# Altium PCB MCU.pcbdoc (part 1 of 2)
Units mil, origin at the board's own origin, x right, y up, seen from the top; angles counter-clockwise.
Board outline 2362.2 x 2637.8 mil, 2 copper layers (Top Layer, Bottom Layer), stack 62.2 mil thick; 37 components, 44 nets, 211 pads, 87 vias.
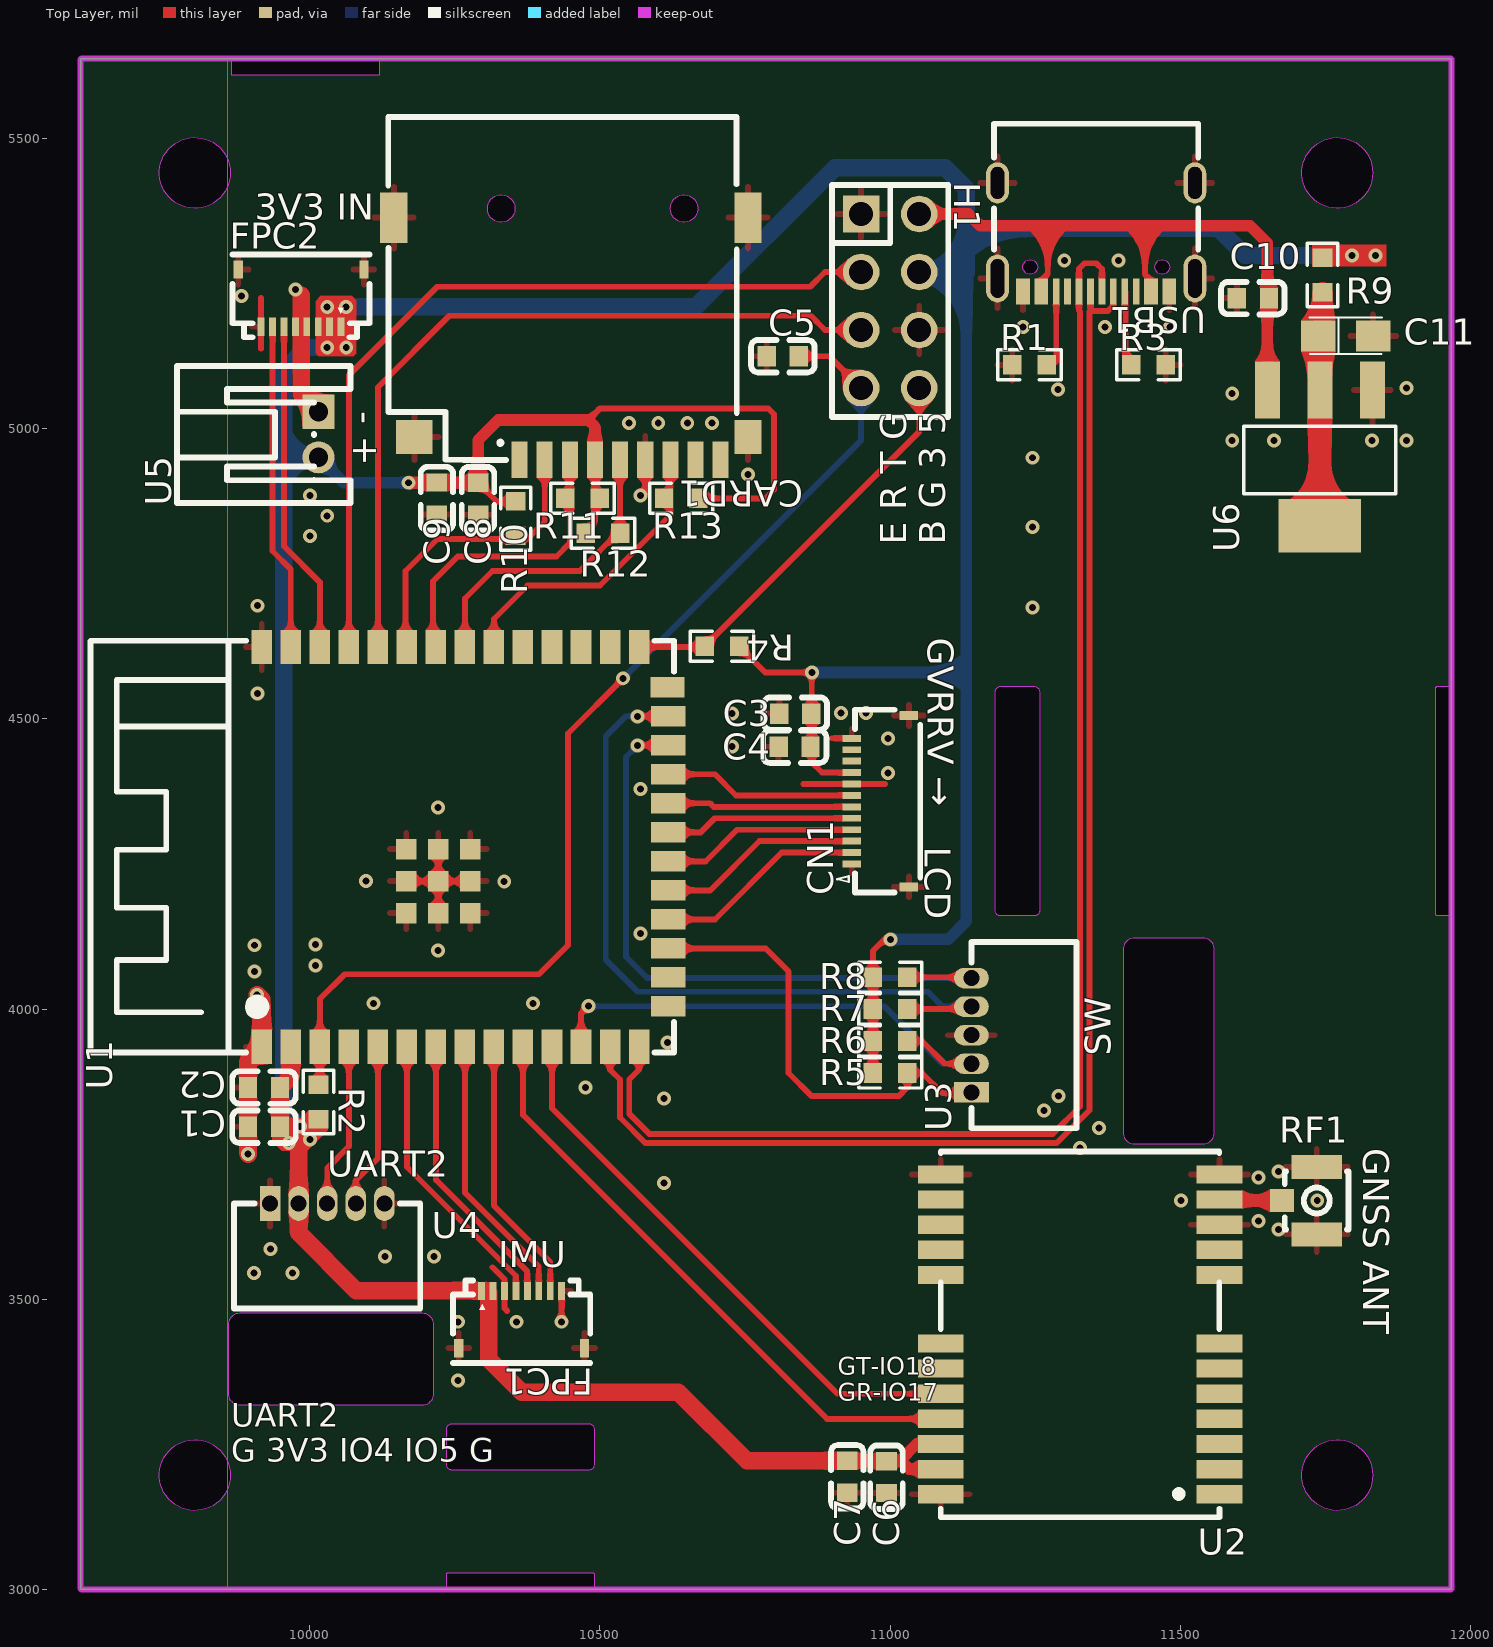
[diagram p0: Top Layer view]
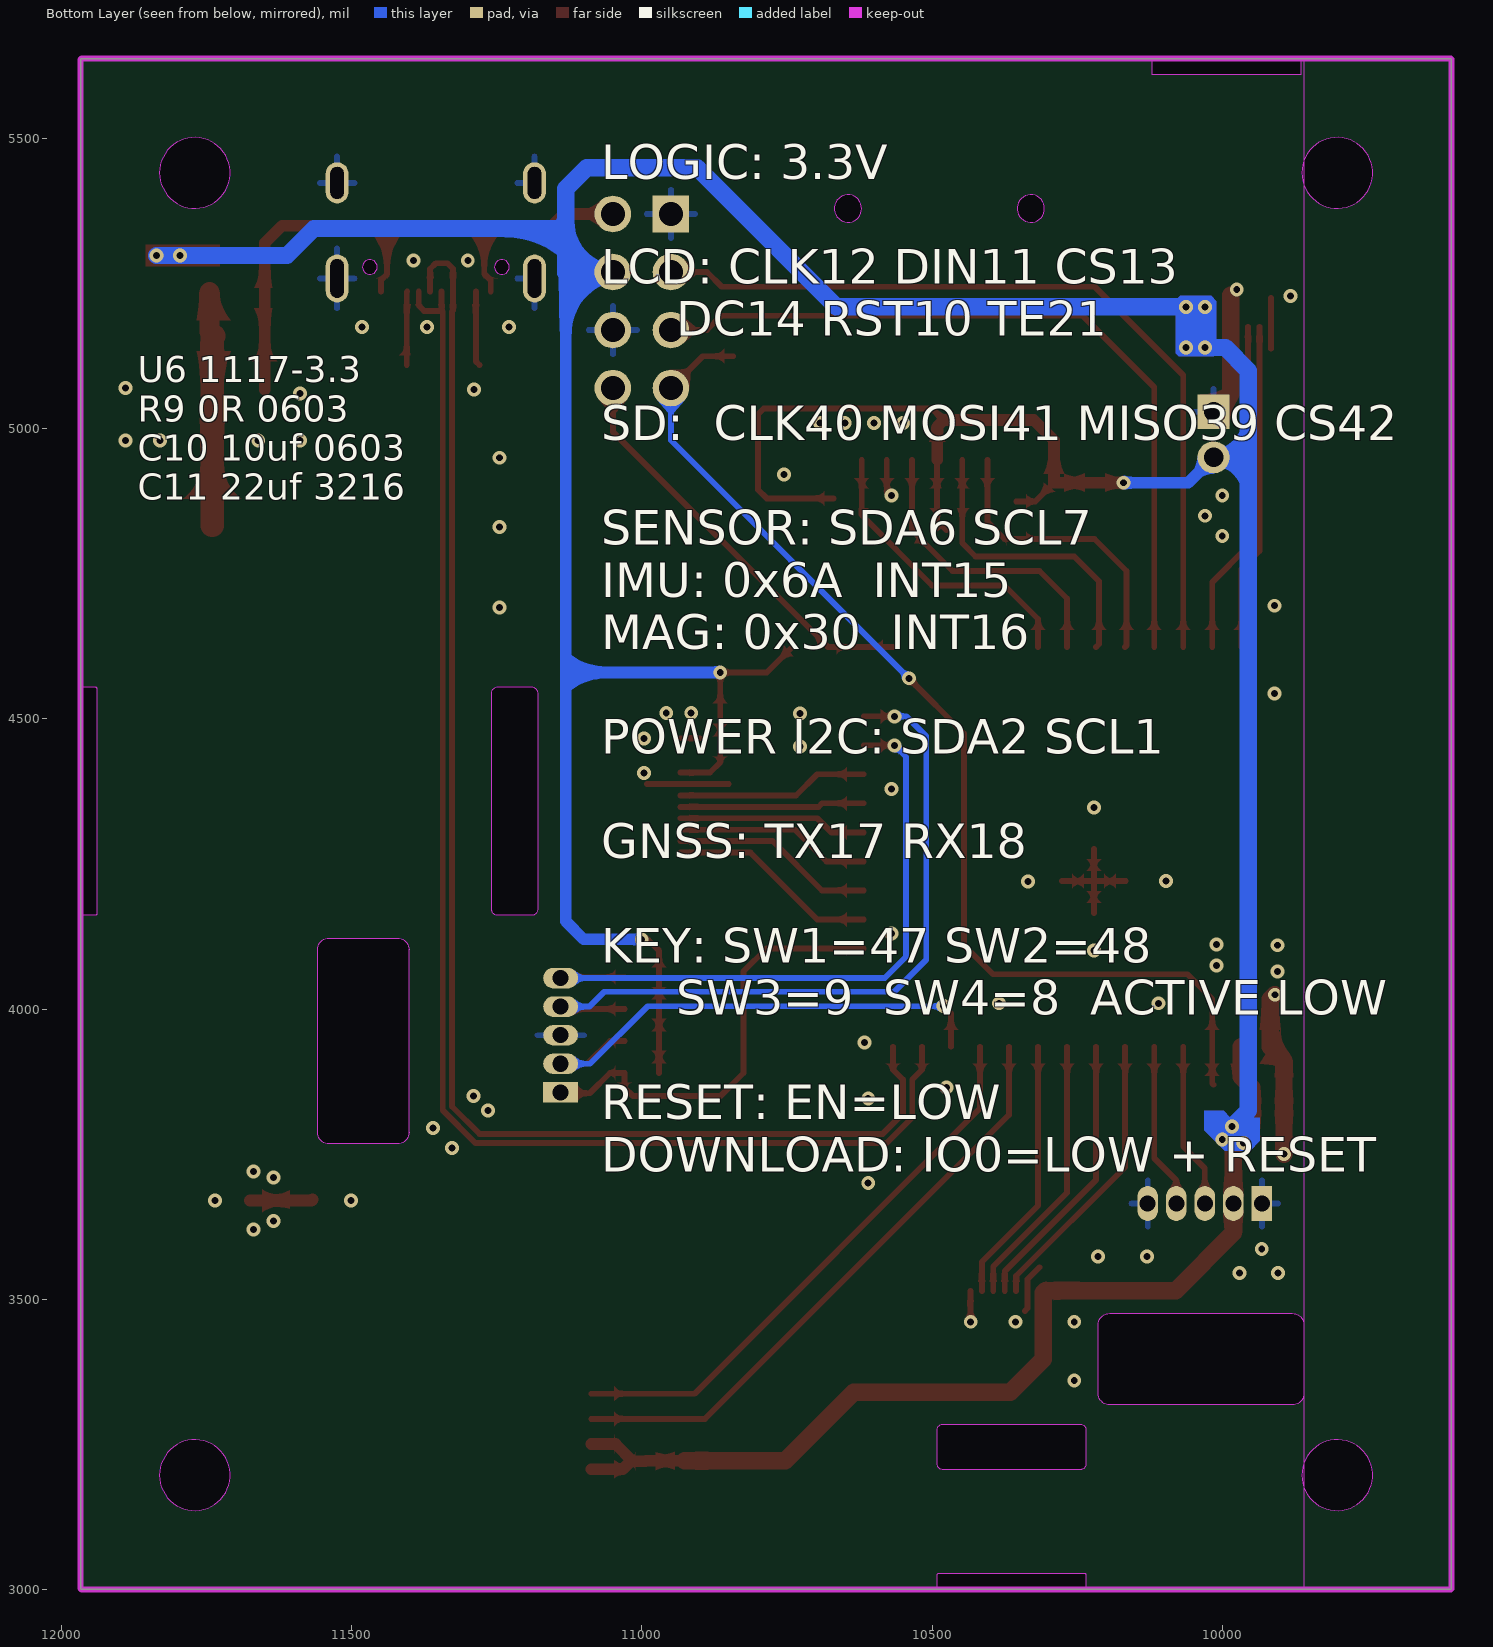
[diagram p1: Bottom Layer view, seen from below]

## Layer stack, top to bottom
Top Solder Mask Layer: solder mask 0.4, Dk 3.3
Top Layer: signal copper 1.4
Dielectric1: surface 59.4, FR4, Dk 4.5
Bottom Layer: signal copper 1.4
Bottom Solder Mask Layer: solder mask 0.4, Dk 3.3

## Board outline
9607,5637.8 ccw(c9607,5635.8) 9605,5635.8 9605,3002 ccw(c9607,3002) 9607,3000 11965.2,3000 ccw(c11965.2,3002) 11967.2,3002 11967.2,5635.8 ccw(c11965.2,5635.8) 11965.2,5637.8
cut-out: 9862.9,3196.9 9862.5,3189.9 9861.3,3183 9859.3,3176.3 9856.6,3169.9 9853.2,3163.9 9849.1,3158.2 9844.4,3153.1 9839.1,3148.5 9833.4,3144.6 9827.2,3141.3 9820.7,3138.8 9814,3137 9807.1,3136.1 9800.1,3135.9 9793.2,3136.4 9786.3,3137.8 9779.7,3140 9773.4,3142.9 9767.4,3146.5 9761.9,3150.7 9756.9,3155.6 9752.5,3161 9748.7,3166.8 9745.6,3173.1 9743.3,3179.7 9741.7,3186.4 9740.9,3193.4 9740.9,3200.3 9741.7,3207.3 9743.3,3214 9745.6,3220.6 9748.7,3226.9 9752.5,3232.7 9756.9,3238.1 9761.9,3243 9767.4,3247.2 9773.4,3250.8 9779.7,3253.7 9786.3,3255.9 9793.2,3257.3 9800.1,3257.8 9807.1,3257.7 9814,3256.7 9820.7,3254.9 9827.2,3252.4 9833.4,3249.1 9839.1,3245.2 9844.4,3240.6 9849.1,3235.5 9853.2,3229.8 9856.6,3223.8 9859.3,3217.4 9861.3,3210.7 9862.5,3203.8
cut-out: 9862.9,5440.9 9862.5,5434 9861.3,5427.1 9859.3,5420.4 9856.6,5414 9853.2,5408 9849.1,5402.3 9844.4,5397.2 9839.1,5392.6 9833.4,5388.7 9827.2,5385.4 9820.7,5382.9 9814,5381.1 9807.1,5380.1 9800.1,5379.9 9793.2,5380.5 9786.3,5381.9 9779.7,5384.1 9773.4,5387 9767.4,5390.6 9761.9,5394.8 9756.9,5399.7 9752.5,5405.1 9748.7,5410.9 9745.6,5417.2 9743.3,5423.8 9741.7,5430.5 9740.9,5437.5 9740.9,5444.4 9741.7,5451.4 9743.3,5458.1 9745.6,5464.7 9748.7,5471 9752.5,5476.8 9756.9,5482.2 9761.9,5487.1 9767.4,5491.3 9773.4,5494.9 9779.7,5497.8 9786.3,5500 9793.2,5501.3 9800.1,5501.9 9807.1,5501.7 9814,5500.8 9820.7,5499 9827.2,5496.5 9833.4,5493.2 9839.1,5489.3 9844.4,5484.7 9849.1,5479.6 9853.2,5473.9 9856.6,5467.9 9859.3,5461.5 9861.3,5454.8 9862.5,5447.9
cut-out: 11831.4,3196.9 11831,3189.9 11829.8,3183 11827.8,3176.3 11825.1,3169.9 11821.7,3163.9 11817.6,3158.2 11812.9,3153.1 11807.6,3148.5 11801.9,3144.6 11795.7,3141.3 11789.2,3138.8 11782.5,3137 11775.6,3136.1 11768.6,3135.9 11761.7,3136.4 11754.8,3137.8 11748.2,3140 11741.9,3142.9 11735.9,3146.5 11730.4,3150.7 11725.4,3155.6 11721,3161 11717.2,3166.8 11714.1,3173.1 11711.8,3179.7 11710.2,3186.4 11709.4,3193.4 11709.4,3200.3 11710.2,3207.3 11711.8,3214 11714.1,3220.6 11717.2,3226.9 11721,3232.7 11725.4,3238.1 11730.4,3243 11735.9,3247.2 11741.9,3250.8 11748.2,3253.7 11754.8,3255.9 11761.7,3257.3 11768.6,3257.8 11775.6,3257.7 11782.5,3256.7 11789.2,3254.9 11795.7,3252.4 11801.9,3249.1 11807.6,3245.2 11812.9,3240.6 11817.6,3235.5 11821.7,3229.8 11825.1,3223.8 11827.8,3217.4 11829.8,3210.7 11831,3203.8
cut-out: 11831.4,5440.9 11831,5434 11829.8,5427.1 11827.8,5420.4 11825.1,5414 11821.7,5408 11817.6,5402.3 11812.9,5397.2 11807.6,5392.6 11801.9,5388.7 11795.7,5385.4 11789.2,5382.9 11782.5,5381.1 11775.6,5380.1 11768.6,5379.9 11761.7,5380.5 11754.8,5381.9 11748.2,5384.1 11741.9,5387 11735.9,5390.6 11730.4,5394.8 11725.4,5399.7 11721,5405.1 11717.2,5410.9 11714.1,5417.2 11711.8,5423.8 11710.2,5430.5 11709.4,5437.5 11709.4,5444.4 11710.2,5451.4 11711.8,5458.1 11714.1,5464.7 11717.2,5471 11721,5476.8 11725.4,5482.2 11730.4,5487.1 11735.9,5491.3 11741.9,5494.9 11748.2,5497.8 11754.8,5500 11761.7,5501.3 11768.6,5501.9 11775.6,5501.7 11782.5,5500.8 11789.2,5499 11795.7,5496.5 11801.9,5493.2 11807.6,5489.3 11812.9,5484.7 11817.6,5479.6 11821.7,5473.9 11825.1,5467.9 11827.8,5461.5 11829.8,5454.8 11831,5447.9
cut-out: 9879,3475.6 ccw(c9879,3455.9) 9859.3,3455.9 9859.3,3337.8 ccw(c9879,3337.8) 9879,3318.1 10194,3318.1 ccw(c10194,3337.8) 10213.7,3337.8 10213.7,3455.9 ccw(c10194,3455.9) 10194,3475.6 9879,3475.6
cut-out: 11401.3,3787.5 ccw(c11420.9,3787.5) 11420.9,3767.8 11539.1,3767.8 ccw(c11539.1,3787.5) 11558.7,3787.5 11558.7,4102.5 ccw(c11539.1,4102.5) 11539.1,4122.2 11420.9,4122.2 ccw(c11420.9,4102.5) 11401.3,4102.5
cut-out: 11189.6,4555.1 ccw(c11189.6,4545.3) 11179.8,4545.3 11179.8,4171.3 ccw(c11189.6,4171.3) 11189.6,4161.4 11248.7,4161.4 ccw(c11248.7,4171.3) 11258.5,4171.3 11258.5,4545.3 ccw(c11248.7,4545.3) 11248.7,4555.1 11189.6,4555.1
cut-out: 10244.8,3285 ccw(c10244.8,3275.2) 10235,3275.2 10235,3216.1 ccw(c10244.8,3216.1) 10244.8,3206.3 10481.1,3206.3 ccw(c10481.1,3216.1) 10490.9,3216.1 10490.9,3275.2 ccw(c10481.1,3275.2) 10481.1,3285 10244.8,3285
cut-out: 9864.3,5637.8 9864.3,5610.2 10120.2,5610.2 10120.2,5637.8
cut-out: 11941.6,4555.1 ccw(c11941.6,4553.1) 11939.6,4553.1 11939.6,4163.4 ccw(c11941.6,4163.4) 11941.6,4161.4 11965.2,4161.4 ccw(c11965.2,4163.4) 11967.2,4163.4 11967.2,4553.1 ccw(c11965.2,4553.1) 11965.2,4555.1
cut-out: 10236.9,3027.6 ccw(c10236.9,3025.6) 10234.9,3025.6 10234.9,3002 ccw(c10236.9,3002) 10236.9,3000 10488.9,3000 ccw(c10488.9,3002) 10490.8,3002 10490.8,3025.6 ccw(c10488.9,3025.6) 10488.9,3027.6 10236.9,3027.6

## Design rules (kind name [scope] priority, off if disabled: settings)
BoardOutlineClearance copperThickness1oz [All] p0: genericclearance=10 ignorepadtopadclearanceinfootprint=FALSE except(0: Arc-SplitContinuation Track-SplitContinuation SMDPad-SplitContinuation THPad-SplitContinuation Via-SplitContinuation Fill-SplitContinuation Poly-SplitContinuation Region-SplitContinuation Text-SplitContinuation)
BoardOutlineClearance copperThickness2oz [All] p0: genericclearance=10 ignorepadtopadclearanceinfootprint=FALSE except(0: Arc-SplitContinuation Track-SplitContinuation SMDPad-SplitContinuation THPad-SplitContinuation Via-SplitContinuation Fill-SplitContinuation Poly-SplitContinuation Region-SplitContinuation Text-SplitContinuation)
BoardOutlineClearance otherClearance [All] p0: genericclearance=10 ignorepadtopadclearanceinfootprint=FALSE except(0: Arc-SplitContinuation Track-SplitContinuation SMDPad-SplitContinuation THPad-SplitContinuation Via-SplitContinuation Fill-SplitContinuation Poly-SplitContinuation Region-SplitContinuation Text-SplitContinuation)
Clearance copperThickness1oz [All] p1: gap=7 ignorepadtopadclearanceinfootprint=FALSE
Clearance copperThickness2oz [All] p1: gap=7 ignorepadtopadclearanceinfootprint=FALSE
Clearance otherClearance [All] p1: gap=7 ignorepadtopadclearanceinfootprint=FALSE
DiffPairsRouting differentialPair [All] p1: maxuncoupledlength=10 minlimit=6 maxlimit=Infinity mostfreqgap=6 toplayer_minwidth=5 toplayer_prefwidth=10 toplayer_maxwidth=100 bottomlayer_minwidth=5 bottomlayer_prefwidth=10 bottomlayer_maxwidth=100
PasteMaskExpansion pasteMaskExpansion [All] p1: expansion=0
PlaneConnect innerPlane [All] p1: planeconnectstyle=Relief reliefexpansion=20 reliefentries=4 reliefconductorwidth=10 reliefairgap=10
PolygonConnect copperRegion [All] p1: connectstyle=Relief reliefentries=4 reliefconductorwidth=10 polygonreliefangle="90 Angle" airgapwidth=10
RoutingVias viaSize [All] p1: viastyle="Through Hole" holewidth=12.0078 minholewidth=11.811 maxholewidth=248.0314 width=12.0078 minwidth=11.811 maxwidth=248.0314
SolderMaskExpansion solderMaskExpansion [IsVia] p1: useseparateexpansions=TRUE expansion=-1000 expansionbottom=-1000
SolderMaskExpansion solderMaskExpansion [All] p2: useseparateexpansions=TRUE expansion=2 expansionbottom=2
Width copperThickness1oz [All] p1: maxlimit=100 minlimit=5 preferedwidth=10
Width copperThickness2oz [All] p1: maxlimit=100 minlimit=8 preferedwidth=10

## Components (designator, comment, footprint, x,y, rotation, side; value= is the part's Value field where it differs from the comment)
C1 "10uF" C0603#1 9921.2,3797.3 r180 top
C2 "100nF" C0603#1 9921.2,3864.9 r180 top
C3 "100nF" C0603#1 10836.6,4509.1 r0 top
C4 "10uF" C0603#2 10835.4,4452.1 r0 top
C5 "10uF" C0603#3 10815,5125 r0 top
C6 "100nF" C0603#1 10993.7,3193.5 r90 top
C7 "10uF" C0603#2 10926,3194.2 r90 top
C8 "10uF" C0603#2 10289.9,4879.4 r90 top
C9 "100nF" C0603#2 10218.9,4879.7 r90 top
C10 "10uF" C0603#3 11625,5225 r0 top
C11 "22uF" CASE-A_3216 11785,5160 r0 top
CARD1 "TF PUSH" TF-SMD_TF-PUSH 10450,5155 r180 top
CN1 "HC-FPC-05-09-12RLTAG" CONN-SMD_12P-P0.50_HCTL_HC-FPC-05-09-12RLTAG 10983,4358.3 r90 top
FPC1 "HC-FPC-05-09-8RLTAG" FPC-SMD_8P-P0.50_HC-FPC-05-09-8RLTAG 10365,3465 r180 top
FPC2 "HC-FPC-05-09-8RLTAG" FPC-SMD_8P-P0.50_HC-FPC-05-09-8RLTAG 9985,5225 r0 top
H1 "LAIL-PZ2.54-4PX2-L" HDR-TH_LAIL-PZ2.54-4PX2-L 11000,5220 r270 top
R1 "5.1kΩ" R0603 11240,5110 r180 top
R2 "10kΩ" R0603 10015,3840 r270 top
R3 "5.1kΩ" R0603 11445,5110 r0 top
R4 "10kΩ" R0603 10710,4625 r180 top
R5 "10kΩ" R0603 11000,3890 r0 top
R6 "10kΩ" R0603 11000,3945 r0 top
R7 "10kΩ" R0603 11000,4000 r0 top
R8 "10kΩ" R0603 11000,4055 r0 top
R9 "0Ω" R0603 11745,5265 r270 top
R10 "10kΩ" R0603 10355,4845 r90 top
R11 "10kΩ" R0603 10470,4880 r0 top
R12 "10kΩ" R0603 10505,4820 r180 top
R13 "10kΩ" R0603 10640,4880 r0 top
RF1 "6GHz" IPEX-SMD_BWIPX-1-001E 11705,3670 r0 top
U1 "2.4GHz" WIRELM-SMD_ESP32-S3-WROOM-1 10267.5,4279.5 r90 top
U2 "ATGM332D-F8N76" GPS-SMD_ATGM332D-6S74 11327.2,3439.5 r0 top
U3 "BX-MX1.25-5PWZ" CONN-TH_5P-P1.25_BX-MX1.25-5PWZ 11140,3955 r90 top
U4 "BX-MX1.25-5PWZ" CONN-TH_5P-P1.25_BX-MX1.25-5PWZ 10030,3665 r0 top
U5 "S2B-PH-K-S(LF)(SN)" CONN-TH_S2B-PH-K-S-LF-SN 10015,4990 r90 top
U6 "AMS1117-3.3" SOT-223-3_L6.5-W3.4-P2.30-LS7.0-BR 11740.4,4950 r90 top
USB1 "LAIL-TYPE-C-16PIN-08-WT" TYPE-C-SMD_LAIL-TYPE-C-16PIN-08-WT 11355,5330 r180 top

## Footprints (in the part's own frame and the unit in brackets; to place one, negate y for a bottom-side part, rotate by r counter-clockwise, add the part's x,y. Pads: shape width x height; smd on the part's side, far side on the other; paste and mask are expansions set on the pad)
C0603#1 [mil]
  rect 31.5x35.4 smd: 1(-27.5,0) 2(27.6,0)
  silkscreen extent -55,-28 55,28
C0603#2 [mil]
  rect 31.5x35.4 smd: 1(-27.6,0) 2(27.5,0)
  silkscreen extent -55,-28 55,28
C0603#3 [mil]
  rect 31.5x35.4 smd: 1(-27.6,0) 2(27.6,0)
  silkscreen extent -55,-28 55,28
CASE-A_3216 [mil]
  rect 59.1x53.5 smd: 1(-47.2,0) 2(47.2,0)
  silkscreen extent -63,-32 63,32
CONN-SMD_12P-P0.50_HCTL_HC-FPC-05-09-12RLTAG [mil]
  rect 11.8x31.5 smd paste+0 mask+2: 1(-108.3,49.3) 2(-88.6,49.3) 3(-68.9,49.3) 4(-49.2,49.3) 5(-29.6,49.3) 6(-9.9,49.3) 7(9.8,49.3) 8(29.5,49.3) 9(49.2,49.3) 10(68.9,49.3) 11(88.6,49.3) 12(108.2,49.3)
  rect 15.7x31.5 smd paste+0 mask+2: 13(147.6,-49.2) 14(-147.7,-49.2)
  silkscreen extent -158,-69 157,74
CONN-TH_5P-P1.25_BX-MX1.25-5PWZ [mil]
  rect 35.4x60 hole 27.6: 1(-98.4,0)
  oval 35.4x60 hole 27.6: 2(-49.2,0) 3(0,0) 4(49.2,0) 5(98.4,0)
  silkscreen extent -160,-181 160,0
CONN-TH_S2B-PH-K-S-LF-SN [mil]
  rect 59.1x55.1 hole 33.5: 1(39.4,0)
  round 55.1 hole 33.5: 2(-39.4,0)
  silkscreen extent -118,-55 118,244
FPC-SMD_8P-P0.50_HC-FPC-05-09-8RLTAG [mil]
  rect 11.8x31.5 smd paste+0 mask+2: 1(68.9,-49.2) 2(49.2,-49.2) 3(29.5,-49.2) 4(9.8,-49.2) 5(-9.8,-49.2) 6(-29.5,-49.2) 7(-49.2,-49.2) 8(-68.9,-49.2)
  rect 15.7x31.5 smd paste+0 mask+2: 9(-108.3,49.2) 10(108.3,49.2)
  silkscreen extent -118,-67 118,75
GPS-SMD_ATGM332D-6S74 [mil]
  rect 78.7x31.5 smd paste+0 mask+2: 1(240.2,-275.6) 2(240.2,-232.3) 3(240.2,-189) 4(240.2,-145.6) 5(240.2,-102.3) 6(240.2,-59) 7(240.2,-15.7) 8(240.2,102.4) 9(240.2,145.7) 10(240.2,189) 11(240.2,232.3) 12(240.2,275.6) 13(-240.1,275.6) 14(-240.1,232.3) 15(-240.1,189) 16(-240.1,145.7) 17(-240.1,102.4) 18(-240.1,-15.7) 19(-240.1,-59) 20(-240.1,-102.3) 21(-240.1,-145.6) 22(-240.1,-189) 23(-240.1,-232.3) 24(-240.1,-275.6)
  silkscreen extent -240,-315 240,315
HDR-TH_LAIL-PZ2.54-4PX2-L [mil]
  rect 63x63 hole 41.3 paste+0 mask+2: 1(-150,-50)
  round 63 hole 41.3 paste+0 mask+2: 2(-150,50) 3(-50,-50) 4(-50,50) 5(50,-50) 6(50,50) 7(150,-50) 8(150,50)
  silkscreen extent -200,-100 200,100
IPEX-SMD_BWIPX-1-001E [mil]
  rect 41.3x39.4 smd: 1(-30,0)
  rect 86.6x41.3 smd: 2(30,-58.1) 3(30,58.1)
  silkscreen extent -25,-50 85,50
R0603 [mil]
  rect 31.8x34 smd paste-3937 mask+2: 1(-29.7,0) 2(29.7,0)
  silkscreen extent -54,-26 54,26
SOT-223-3_L6.5-W3.4-P2.30-LS7.0-BR [mil]
  rect 98.4x43.3 smd: 1(116.9,-90.6) 2(116.9,0) 3(116.9,90.5)
  rect 92.1x141.7 smd: 4(-116.9,0)
  silkscreen extent -62,-131 54,131
TF-SMD_TF-PUSH [mil]
  rect 27.6x63 smd: 1(88.6,208.7) 2(45.3,208.7) 3(2,208.7) 4(-41.3,208.7) 5(-84.6,208.7) 6(-128,208.7) 7(-171.3,208.7) 8(-214.6,208.7) CD(-257.9,208.7)
  rect 47.2x59.1 smd: 10(-305.1,169.3)
  rect 47.2x86.6 smd: 11(-305.1,-208.7) 12(305.1,-208.7)
  rect 63x59.1 smd: 13(269.7,169.3)
  Board Outline Layer lines w0.1: 143.7,-224.4 143.3,-228.6 142.2,-232.7 140.4,-236.5 137.9,-240 134.8,-242.9 131.3,-245.2 127.4,-246.9 123.3,-247.8 119,-248 114.8,-247.4 110.8,-246.1 107.1,-244.1 103.8,-241.5 101,-238.3 98.8,-234.7 97.3,-230.7 96.6,-226.5 96.6,-222.3 97.3,-218.1 98.8,-214.2 101,-210.5 103.8,-207.3 107.1,-204.7 110.8,-202.7 114.8,-201.4 119,-200.8 123.3,-201 127.4,-201.9 131.3,-203.6 134.8,-205.9 137.9,-208.9 140.4,-212.3 142.2,-216.1 143.3,-220.2 143.7,-224.4 ; -171.3,-224.4 -171.6,-228.6 -172.8,-232.7 -174.6,-236.5 -177.1,-240 -180.2,-242.9 -183.7,-245.2 -187.6,-246.9 -191.7,-247.8 -195.9,-248 -200.1,-247.4 -204.2,-246.1 -207.9,-244.1 -211.2,-241.5 -214,-238.3 -216.2,-234.7 -217.7,-230.7 -218.4,-226.5 -218.4,-222.3 -217.7,-218.1 -216.2,-214.2 -214,-210.5 -211.2,-207.3 -207.9,-204.7 -204.2,-202.7 -200.1,-201.4 -195.9,-200.8 -191.7,-201 -187.6,-201.9 -183.7,-203.6 -180.2,-205.9 -177.1,-208.9 -174.6,-212.3 -172.8,-216.1 -171.6,-220.2 -171.3,-224.4
  Board Outline Layer region: -171.3,-224.4 -171.6,-228.6 -172.8,-232.7 -174.6,-236.5 -177.1,-240 -180.2,-242.9 -183.7,-245.2 -187.6,-246.9 -191.7,-247.8 -195.9,-248 -200.1,-247.4 -204.2,-246.1 -207.9,-244.1 -211.2,-241.5 -214,-238.3 -216.2,-234.7 -217.7,-230.7 -218.4,-226.5 -218.4,-222.3 -217.7,-218.1 -216.2,-214.2 -214,-210.5 -211.2,-207.3 -207.9,-204.7 -204.2,-202.7 -200.1,-201.4 -195.9,-200.8 -191.7,-201 -187.6,-201.9 -183.7,-203.6 -180.2,-205.9 -177.1,-208.9 -174.6,-212.3 -172.8,-216.1 -171.6,-220.2
  Board Outline Layer region: -171.3,-224.4 -171.6,-228.6 -172.8,-232.7 -174.6,-236.5 -177.1,-240 -180.2,-242.9 -183.7,-245.2 -187.6,-246.9 -191.7,-247.8 -195.9,-248 -200.1,-247.4 -204.2,-246.1 -207.9,-244.1 -211.2,-241.5 -214,-238.3 -216.2,-234.7 -217.7,-230.7 -218.4,-226.5 -218.4,-222.3 -217.7,-218.1 -216.2,-214.2 -214,-210.5 -211.2,-207.3 -207.9,-204.7 -204.2,-202.7 -200.1,-201.4 -195.9,-200.8 -191.7,-201 -187.6,-201.9 -183.7,-203.6 -180.2,-205.9 -177.1,-208.9 -174.6,-212.3 -172.8,-216.1 -171.6,-220.2
  Board Outline Layer region: 143.7,-224.4 143.3,-228.6 142.2,-232.7 140.4,-236.5 137.9,-240 134.8,-242.9 131.3,-245.2 127.4,-246.9 123.3,-247.8 119,-248 114.8,-247.4 110.8,-246.1 107.1,-244.1 103.8,-241.5 101,-238.3 98.8,-234.7 97.3,-230.7 96.6,-226.5 96.6,-222.3 97.3,-218.1 98.8,-214.2 101,-210.5 103.8,-207.3 107.1,-204.7 110.8,-202.7 114.8,-201.4 119,-200.8 123.3,-201 127.4,-201.9 131.3,-203.6 134.8,-205.9 137.9,-208.9 140.4,-212.3 142.2,-216.1 143.3,-220.2
  Board Outline Layer region: 143.7,-224.4 143.3,-228.6 142.2,-232.7 140.4,-236.5 137.9,-240 134.8,-242.9 131.3,-245.2 127.4,-246.9 123.3,-247.8 119,-248 114.8,-247.4 110.8,-246.1 107.1,-244.1 103.8,-241.5 101,-238.3 98.8,-234.7 97.3,-230.7 96.6,-226.5 96.6,-222.3 97.3,-218.1 98.8,-214.2 101,-210.5 103.8,-207.3 107.1,-204.7 110.8,-202.7 114.8,-201.4 119,-200.8 123.3,-201 127.4,-201.9 131.3,-203.6 134.8,-205.9 137.9,-208.9 140.4,-212.3 142.2,-216.1 143.3,-220.2
  Multi-Layer board cut-out: -171.3,-224.4 -171.6,-228.6 -172.8,-232.7 -174.6,-236.5 -177.1,-240 -180.2,-242.9 -183.7,-245.2 -187.6,-246.9 -191.7,-247.8 -195.9,-248 -200.1,-247.4 -204.2,-246.1 -207.9,-244.1 -211.2,-241.5 -214,-238.3 -216.2,-234.7 -217.7,-230.7 -218.4,-226.5 -218.4,-222.3 -217.7,-218.1 -216.2,-214.2 -214,-210.5 -211.2,-207.3 -207.9,-204.7 -204.2,-202.7 -200.1,-201.4 -195.9,-200.8 -191.7,-201 -187.6,-201.9 -183.7,-203.6 -180.2,-205.9 -177.1,-208.9 -174.6,-212.3 -172.8,-216.1 -171.6,-220.2
  Multi-Layer board cut-out: 143.7,-224.4 143.3,-228.6 142.2,-232.7 140.4,-236.5 137.9,-240 134.8,-242.9 131.3,-245.2 127.4,-246.9 123.3,-247.8 119,-248 114.8,-247.4 110.8,-246.1 107.1,-244.1 103.8,-241.5 101,-238.3 98.8,-234.7 97.3,-230.7 96.6,-226.5 96.6,-222.3 97.3,-218.1 98.8,-214.2 101,-210.5 103.8,-207.3 107.1,-204.7 110.8,-202.7 114.8,-201.4 119,-200.8 123.3,-201 127.4,-201.9 131.3,-203.6 134.8,-205.9 137.9,-208.9 140.4,-212.3 142.2,-216.1 143.3,-220.2
  silkscreen extent -286,-382 315,209
TYPE-C-SMD_LAIL-TYPE-C-16PIN-08-WT [mil]
  oval 39.4x82.7 hole 23.6 slot 66.9 at 90 deg paste+0 mask+2: 13(170.1,71.1) 16(-170.1,71.1)
  oval 39.4x70.9 hole 23.6 slot 55.1 at 90 deg paste+0 mask+2: 14(170.1,-93.5) 15(-170.1,-93.5)
  rect 23.6x44.9 smd paste-3937 mask+2: A1B12(-126,93.5) A4B9(-94.5,93.5) B1A12(126,93.5) B4A9(94.5,93.5)
  rect 11.8x44.9 smd paste-3937 mask+2: A5(-49.2,93.5) A6(-9.8,93.5) A7(9.8,93.5) A8(49.2,93.5) B5(68.9,93.5) B6(29.5,93.5) B7(-29.5,93.5) B8(-68.9,93.5)
  Board Outline Layer lines w0.1: 126.6,51.4 126.2,48.3 125.1,45.4 123.4,42.9 121,40.9 118.3,39.4 115.3,38.7 112.2,38.7 109.2,39.4 106.5,40.9 104.2,42.9 102.5,45.4 101.4,48.3 101,51.4 101.4,54.4 102.5,57.3 104.2,59.9 106.5,61.9 109.2,63.3 112.2,64.1 115.3,64.1 118.3,63.3 121,61.9 123.4,59.9 125.1,57.3 126.2,54.4 126.6,51.4 ; -101,51.4 -101.4,48.3 -102.5,45.4 -104.2,42.9 -106.5,40.9 -109.2,39.4 -112.2,38.7 -115.3,38.7 -118.3,39.4 -121,40.9 -123.4,42.9 -125.1,45.4 -126.2,48.3 -126.6,51.4 -126.2,54.4 -125.1,57.3 -123.4,59.9 -121,61.9 -118.3,63.3 -115.3,64.1 -112.2,64.1 -109.2,63.3 -106.5,61.9 -104.2,59.9 -102.5,57.3 -101.4,54.4 -101,51.4
  Board Outline Layer region: -101,51.4 -101.4,48.3 -102.5,45.4 -104.2,42.9 -106.5,40.9 -109.2,39.4 -112.2,38.7 -115.3,38.7 -118.3,39.4 -121,40.9 -123.4,42.9 -125.1,45.4 -126.2,48.3 -126.6,51.4 -126.2,54.4 -125.1,57.3 -123.4,59.9 -121,61.9 -118.3,63.3 -115.3,64.1 -112.2,64.1 -109.2,63.3 -106.5,61.9 -104.2,59.9 -102.5,57.3 -101.4,54.4
  Board Outline Layer region: -101,51.4 -101.4,48.3 -102.5,45.4 -104.2,42.9 -106.5,40.9 -109.2,39.4 -112.2,38.7 -115.3,38.7 -118.3,39.4 -121,40.9 -123.4,42.9 -125.1,45.4 -126.2,48.3 -126.6,51.4 -126.2,54.4 -125.1,57.3 -123.4,59.9 -121,61.9 -118.3,63.3 -115.3,64.1 -112.2,64.1 -109.2,63.3 -106.5,61.9 -104.2,59.9 -102.5,57.3 -101.4,54.4
  Board Outline Layer region: 126.6,51.4 126.2,48.3 125.1,45.4 123.4,42.9 121,40.9 118.3,39.4 115.3,38.7 112.2,38.7 109.2,39.4 106.5,40.9 104.2,42.9 102.5,45.4 101.4,48.3 101,51.4 101.4,54.4 102.5,57.3 104.2,59.9 106.5,61.9 109.2,63.3 112.2,64.1 115.3,64.1 118.3,63.3 121,61.9 123.4,59.9 125.1,57.3 126.2,54.4
  Board Outline Layer region: 126.6,51.4 126.2,48.3 125.1,45.4 123.4,42.9 121,40.9 118.3,39.4 115.3,38.7 112.2,38.7 109.2,39.4 106.5,40.9 104.2,42.9 102.5,45.4 101.4,48.3 101,51.4 101.4,54.4 102.5,57.3 104.2,59.9 106.5,61.9 109.2,63.3 112.2,64.1 115.3,64.1 118.3,63.3 121,61.9 123.4,59.9 125.1,57.3 126.2,54.4
  Multi-Layer board cut-out: -101,51.4 -101.4,48.3 -102.5,45.4 -104.2,42.9 -106.5,40.9 -109.2,39.4 -112.2,38.7 -115.3,38.7 -118.3,39.4 -121,40.9 -123.4,42.9 -125.1,45.4 -126.2,48.3 -126.6,51.4 -126.2,54.4 -125.1,57.3 -123.4,59.9 -121,61.9 -118.3,63.3 -115.3,64.1 -112.2,64.1 -109.2,63.3 -106.5,61.9 -104.2,59.9 -102.5,57.3 -101.4,54.4
  Multi-Layer board cut-out: 126.6,51.4 126.2,48.3 125.1,45.4 123.4,42.9 121,40.9 118.3,39.4 115.3,38.7 112.2,38.7 109.2,39.4 106.5,40.9 104.2,42.9 102.5,45.4 101.4,48.3 101,51.4 101.4,54.4 102.5,57.3 104.2,59.9 106.5,61.9 109.2,63.3 112.2,64.1 115.3,64.1 118.3,63.3 121,61.9 123.4,59.9 125.1,57.3 126.2,54.4
  silkscreen extent -176,-195 176,21
WIRELM-SMD_ESP32-S3-WROOM-1 [mil]
  rect 59.1x35.4 smd paste+0 mask+2: 1(-344.5,350.2) 2(-344.5,300.2) 3(-344.5,250.2) 4(-344.5,200.2) 5(-344.5,150.2) 6(-344.5,100.2) 7(-344.5,50.2) 8(-344.5,0.2) 9(-344.5,-49.8) 10(-344.5,-99.8) 11(-344.5,-149.8) 12(-344.5,-199.8) 13(-344.5,-249.8) 14(-344.5,-299.8) 27(344.5,-299.8) 28(344.5,-249.8) 29(344.5,-199.8) 30(344.5,-149.8) 31(344.5,-99.8) 32(344.5,-49.8) 33(344.5,0.2) 34(344.5,50.2) 35(344.5,100.2) 36(344.5,150.2) 37(344.5,200.2) 38(344.5,250.2) 39(344.5,300.2) 40(344.5,350.2)
  rect 35.4x59.1 smd paste+0 mask+2: 15(-275,-350.2) 16(-225,-350.2) 17(-175,-350.2) 18(-125,-350.2) 19(-75,-350.2) 20(-25,-350.2) 21(25,-350.2) 22(75,-350.2) 23(125,-350.2) 24(175,-350.2) 25(225,-350.2) 26(275,-349)
  rect 35.4x35.4 smd: 41(-114.2,-8.8) 41(-114.2,46.3) 41(-114.2,101.4) 41(-59,101.4) 41(-59,-8.8) 41(-59,46.3) 41(-3.9,101.4) 41(-3.9,46.3) 41(-3.9,-8.8)
  silkscreen extent -354,-360 355,646

## Via types
v1: diameter 24, hole 12, Top Layer to Bottom Layer, 87 vias

## Nets (pads, with @x,y where several pads share a name; then routed paths per layer and width w, separated by ;. In a path a pad name is that pad's centre, name@x,y a point inside that pad or via, vN(x,y) a via of type N, cw(c..) or ccw(c..) an arc to the next point about the centre after c; other vN are vias at no path point)
3V3: C1.1 C2.1 C3.2 C4.2 C6.2 C7.2 C8.2 C9.2 CARD1.4 CN1.9 FPC1.1 FPC1.2 FPC2.1 FPC2.2 FPC2.3 H1.4 R2.2 R4.1 R5.1 R6.1 R7.1 R8.1 R9.1 R10.2 R11.2 R12.2 R13.2 U1.2 U2.22 U2.23 U4.2 U5.2 | length 9032.1
  Top Layer w10: 9980.8,3765.3 9980.8,3776.1 R2.2@10015,3810.3 ; C8.2@10289.9,4906.9 10322.2,4874.7 R10.2@10355,4874.7 ; R12.2@10475.3,4825 10491.3,4841 CARD1.4@10491.3,4946.3 ; 10480,5015 10500,5035 10790,5035 10800,5025 10800,4895 10785,4880 R13.2@10669.7,4880 ; R4.1@10739.7,4625 10784.7,4580 v1(10865,4580) 10865,4425 10882.5,4407.5 CN1.9@10933.7,4407.5 ; R5.1@10970.3,3890 R6.1@10970.3,3945 R7.1@10970.3,4000 R8.1@10970.3,4055 10970.3,4100.3 10990,4120 v1(11000.3,4120)
  Top Layer w20: v1(10170,4906.9) C8.2@10289.9,4906.9 10289.9,4979.9 10325,5015 10480,5015 10491.3,5003.7 CARD1.4@10491.3,4946.3 ; C7.2@10926,3221.7 10993,3221.7 C6.2@10993.7,3221.1 11016.1,3221.1 ; U2.23@11087.1,3207.2 11032.8,3207.2 11018.9,3221.1 11016.1,3221.1 ; U2.22@11087.1,3250.5 11045.5,3250.5 11016.1,3221.1
  Top Layer w30: U1.2@9967.3,3935 9967.3,3883.5 C2.1@9948.7,3864.9 C1.1@9948.7,3797.3 9980.8,3765.3 U4.2@9980.8,3665 9980.8,3614.2 10080,3515 10305,3515 10308.6,3511.4 10308.6,3396.4 10365,3340 10635,3340 10753.3,3221.7 C7.2@10926,3221.7
  Bottom Layer w20: U5.2@10015,4950.6 10058.7,4906.9 v1(10170,4906.9) ; v1(10865,4580) 11131.2,4580 ; v1(11000.3,4120) 11100,4120 11131.2,4151.2 11131.2,4580 ; 11131.2,5268.8 11131.2,4580
  Bottom Layer w30: v1(9982.9,3797.3) 9955,3825.2 9955,4948.4 ; U5.2@10015,4950.6 9957.2,4950.6 9955,4948.4 ; v1(10030,5140) 9995,5140 9955,5100 9955,4948.4 ; v1(10062.5,5210) 10665,5210 10905,5450 11095,5450 11131.2,5413.8 11131.2,5356.5 ; H1.4@11050,5270 11051.2,5268.8 11131.2,5268.8 11131.2,5356.5 ; v1(11836.1,5298.5) v1(11796.1,5298.5) 11611.5,5298.5 11565,5345 11142.7,5345 11131.2,5356.5
  other v1: 9963.7,3769.4 10000,3775 10062.8,5140 10030,5210
3V3L: C11.1 R9.2 U6.2 U6.4 | length 406.3
  Top Layer w35: C11.1@11737.8,5160 11745,5167.2 R9.2@11745,5235.3
  Top Layer w40: C11.1@11737.8,5160 11740.4,5157.4 U6.2@11740.4,5066.9 U6.4@11740.4,4833.1
5V: C10.2 H1.2 U6.3 USB1.A4B9 USB1.B4A9 | length 1109.9
  Top Layer w10: USB1.B4A9@11260.5,5236.5 11260.5,5256 11271.6,5267.1 11271.6,5350 ; 11438.6,5350 11439.2,5349.5 11439.2,5266.4 11449.5,5256 USB1.A4B9@11449.5,5236.5
  Top Layer w20: H1.2@11050,5370 11135,5370 11155,5350 11271.6,5350 11438.6,5350 11620,5350 11649.9,5320.1 U6.3@11649.9,5066.9
$1N51: RF1.1 U2.11 | length 108.3
  Top Layer w20.6: U2.11@11567.4,3671.8 11569.2,3670 RF1.1@11675,3670
$1N182: R3.1 USB1.A5 | length 127
  Top Layer w10: USB1.A5@11404.2,5236.5 11405.3,5235.4 R3.1@11405.3,5110
$1N183: R1.1 USB1.B5 | length 129.2
  Top Layer w10: R1.1@11279.7,5110 11286.1,5116.4 USB1.B5@11286.1,5236.5
DN: U1.13 USB1.A7 USB1.B7 | length 2459
  Top Layer w10: U1.13@10517.3,3935 10517.3,3895.5 10534.3,3878.5 10534.3,3813.1 10578.4,3769 11286.6,3769 11343.3,3825.7 11343.3,5202.2 11345.2,5204.1 ; USB1.A7@11345.2,5236.5 11345.2,5204.1 ; USB1.B7@11384.5,5236.5 11384.5,5212.3 11375.3,5203.1 11346.1,5203.1 11345.2,5204.1
DP: U1.14 USB1.A6 USB1.B6 | length 2463.4
  Top Layer w10: U1.14@10567.3,3935 10567.3,3895.5 10550.3,3878.5 10550.3,3819.7 10585,3785 11280,3785 11327.3,3832.3 11327.3,5202.2 11325.5,5204.1 USB1.B6@11325.5,5236.5 11325.5,5275.5 11335,5285 11355,5285 11365,5275 11365,5236.7 USB1.A6@11364.8,5236.5
EN: C5.2 H1.7 R2.1 U1.3 | length 1914
  Top Layer w10: R2.1@10015,3869.7 10017.3,3871.9 U1.3@10017.3,3935 10017.3,4017.3 10060,4060 10395,4060 10445,4110 10445,4475 v1(10540,4570) ; C5.2@10842.6,5125 10895,5125 H1.7@10950,5070
  Bottom Layer w10: v1(10540,4570) 10950,4980 H1.7@10950,5070
GND: C1.2 C2.2 C3.1 C4.1 C5.1 C6.1 C7.1 C8.1 C9.1 C10.1 C11.2 CARD1.6 CARD1.10 CARD1.11 CARD1.12 CARD1.13 CN1.1 CN1.8 CN1.12 CN1.13 CN1.14 FPC1.3 FPC1.8 FPC1.9 FPC1.10 FPC2.4 FPC2.5 FPC2.8 FPC2.9 FPC2.10 H1.1 H1.6 R1.2 R3.2 RF1.2 RF1.3 U1.1 U1.40 U1.41 U2.10 U2.12 U2.13 U2.24 U3.3 U4.1 U4.5 U5.1 U6.1 USB1.13 USB1.14 USB1.15 USB1.16 USB1.A1B12 USB1.B1A12 | length 1322.4
  Top Layer w10: 9916.1,5137.8 9916.1,5225 ; FPC2.5@9975.2,5175.8 9975.2,5239.8 9994.8,5220.2 FPC2.4@9994.8,5175.8 ; U1.41@10166.1,4220.5 U1.41@10221.2,4220.5 ; U1.41@10221.2,4165.3 U1.41@10221.2,4220.5 ; U1.41@10221.2,4275.6 U1.41@10221.2,4220.5 ; U1.41@10276.3,4220.5 U1.41@10221.2,4220.5 ; 10315,3555 10335.5,3534.5 FPC1.3@10335.5,3514.2 10335.5,3484.5 10340,3480 ; v1(10433.4,3461.2) 10433.9,3461.7 FPC1.8@10433.9,3514.2 ; v1(10570,4885) 10578,4892.9 CARD1.6@10578,4946.3 ; 10850.3,4387.8 10991,4387.8 ; 10900,4466.5 CN1.12@10933.7,4466.5
  Top Layer w30: v1(9893.6,3750) C1.2@9893.6,3797.3 C2.2@9893.6,3864.9 9893.6,3911.4 U1.1@9917.3,3935 9917.3,4016.7 v1(9909.2,4024.7) ; 9985,5230 9985,5059.4 U5.1@10015,5029.4
  other v1: 10255,3360 10255,3461.2 10356.5,3461.2 9904.1,3545 9970,3545 10129.8,3573.7 10213.9,3573.7 9931.9,3586.9 11669,3620 11635,3635 11501.1,3670 11735.9,3670 10610,3700 11635,3710 11669,3720 11327.2,3760.6 11360,3795 11265,3825 10610,3846 11290,3850 10475,3865 10616.5,3942.6 10110,4010 10384.3,4010 9905,4065 10010,4075 10221.2,4101.2 9905,4110 10010,4111.4 10570,4130 10096.7,4220.5 10335,4220 10221.2,4347.3 10570,4379.5 10996.3,4406.7 10727.2,4452.1 10996.3,4466.5 10727.2,4509.1 10915,4510 10958,4510 9910,4543.8 11245,4691.8 9910,4695 10000,4815 11245,4830.8 10030,4850 10000,4885 10755.1,4921.3 11245,4950 11589.4,4979.7 11661.1,4979.7 11830,4980 11890,4979.7 10550,5010 10600.4,5010 10650.4,5010 10693.2,5010 11589.4,5061 11289,5067.5 11890,5070 11229,5175 11370,5175 11482,5175 9882.6,5228.8 9975,5240 11300,5290 11393.6,5290
GPIO_00: H1.8 R4.2 U1.27 | length 711.6
  Top Layer w10: U1.27@10567.3,4624 10679.4,4624 R4.2@10680.3,4625 11050,4994.7 H1.8@11050,5070
GPIO_01: FPC2.7 U1.39 | length 564.8
  Top Layer w10: FPC2.7@9935.8,5175.8 9935.8,4789.2 9967.3,4757.7 U1.39@9967.3,4624
GPIO_02: FPC2.6 U1.38 | length 577.4
  Top Layer w10: FPC2.6@9955.5,5175.8 9955.5,4797.4 10017.3,4735.5 U1.38@10017.3,4624
GPIO_03: U1.15
GPIO_04: U1.4 U4.3 | length 285.5
  Top Layer w10: U4.3@10030,3665 10030,3725.7 10067.3,3763 U1.4@10067.3,3935
GPIO_05: U1.5 U4.4 | length 285.8
  Top Layer w10: U4.4@10079.2,3665 10079.2,3705 10117.3,3743.1 U1.5@10117.3,3935
GPIO_06: FPC1.4 U1.6 | length 498.7
  Top Layer w10: U1.6@10167.3,3935 10167.3,3727.8 10355.2,3540 FPC1.4@10355.2,3514.2
GPIO_07: FPC1.5 U1.7 | length 486
  Top Layer w10: U1.7@10217.3,3935 10217.3,3705.7 10374.8,3548.1 FPC1.5@10374.8,3514.2
GPIO_08: R6.2 U1.12 U3.2 | length 902.9
  Top Layer w10: U1.12@10467.3,3935 10467.3,3992.3 v1(10480,4005) ; R6.2@11029.7,3945 11055,3945 11094.2,3905.8 U3.2@11140,3905.8
  Bottom Layer w10: v1(10480,4005) 10990,4005 11089.2,3905.8 U3.2@11140,3905.8
GPIO_09: R5.2 U1.17 U3.1 | length 777
  Top Layer w10: U1.17@10617.7,4104.5 10785.5,4104.5 10825,4065 10825,3890 10865,3850 11015,3850 11030,3865 11030,3889.7 R5.2@11029.7,3890 11055,3890 11090,3855 11138.4,3855 U3.1@11140,3856.6
GPIO_10: CN1.2 U1.18 | length 363.7
  Top Layer w10: U1.18@10617.7,4154.5 10698,4154.5 10813.1,4269.7 CN1.2@10933.7,4269.7